# Altium PCB SG2002_work_174.PcbDoc (part 2 of 2)
Units mm, origin at the board's own origin, x right, y up, seen from the top; angles counter-clockwise.
Board outline 38 x 38 mm, 4 copper layers (TOP, GND, POWER, BOTTOM), stack 0.732 mm thick; 197 components, 122 nets, 613 pads, 461 vias.
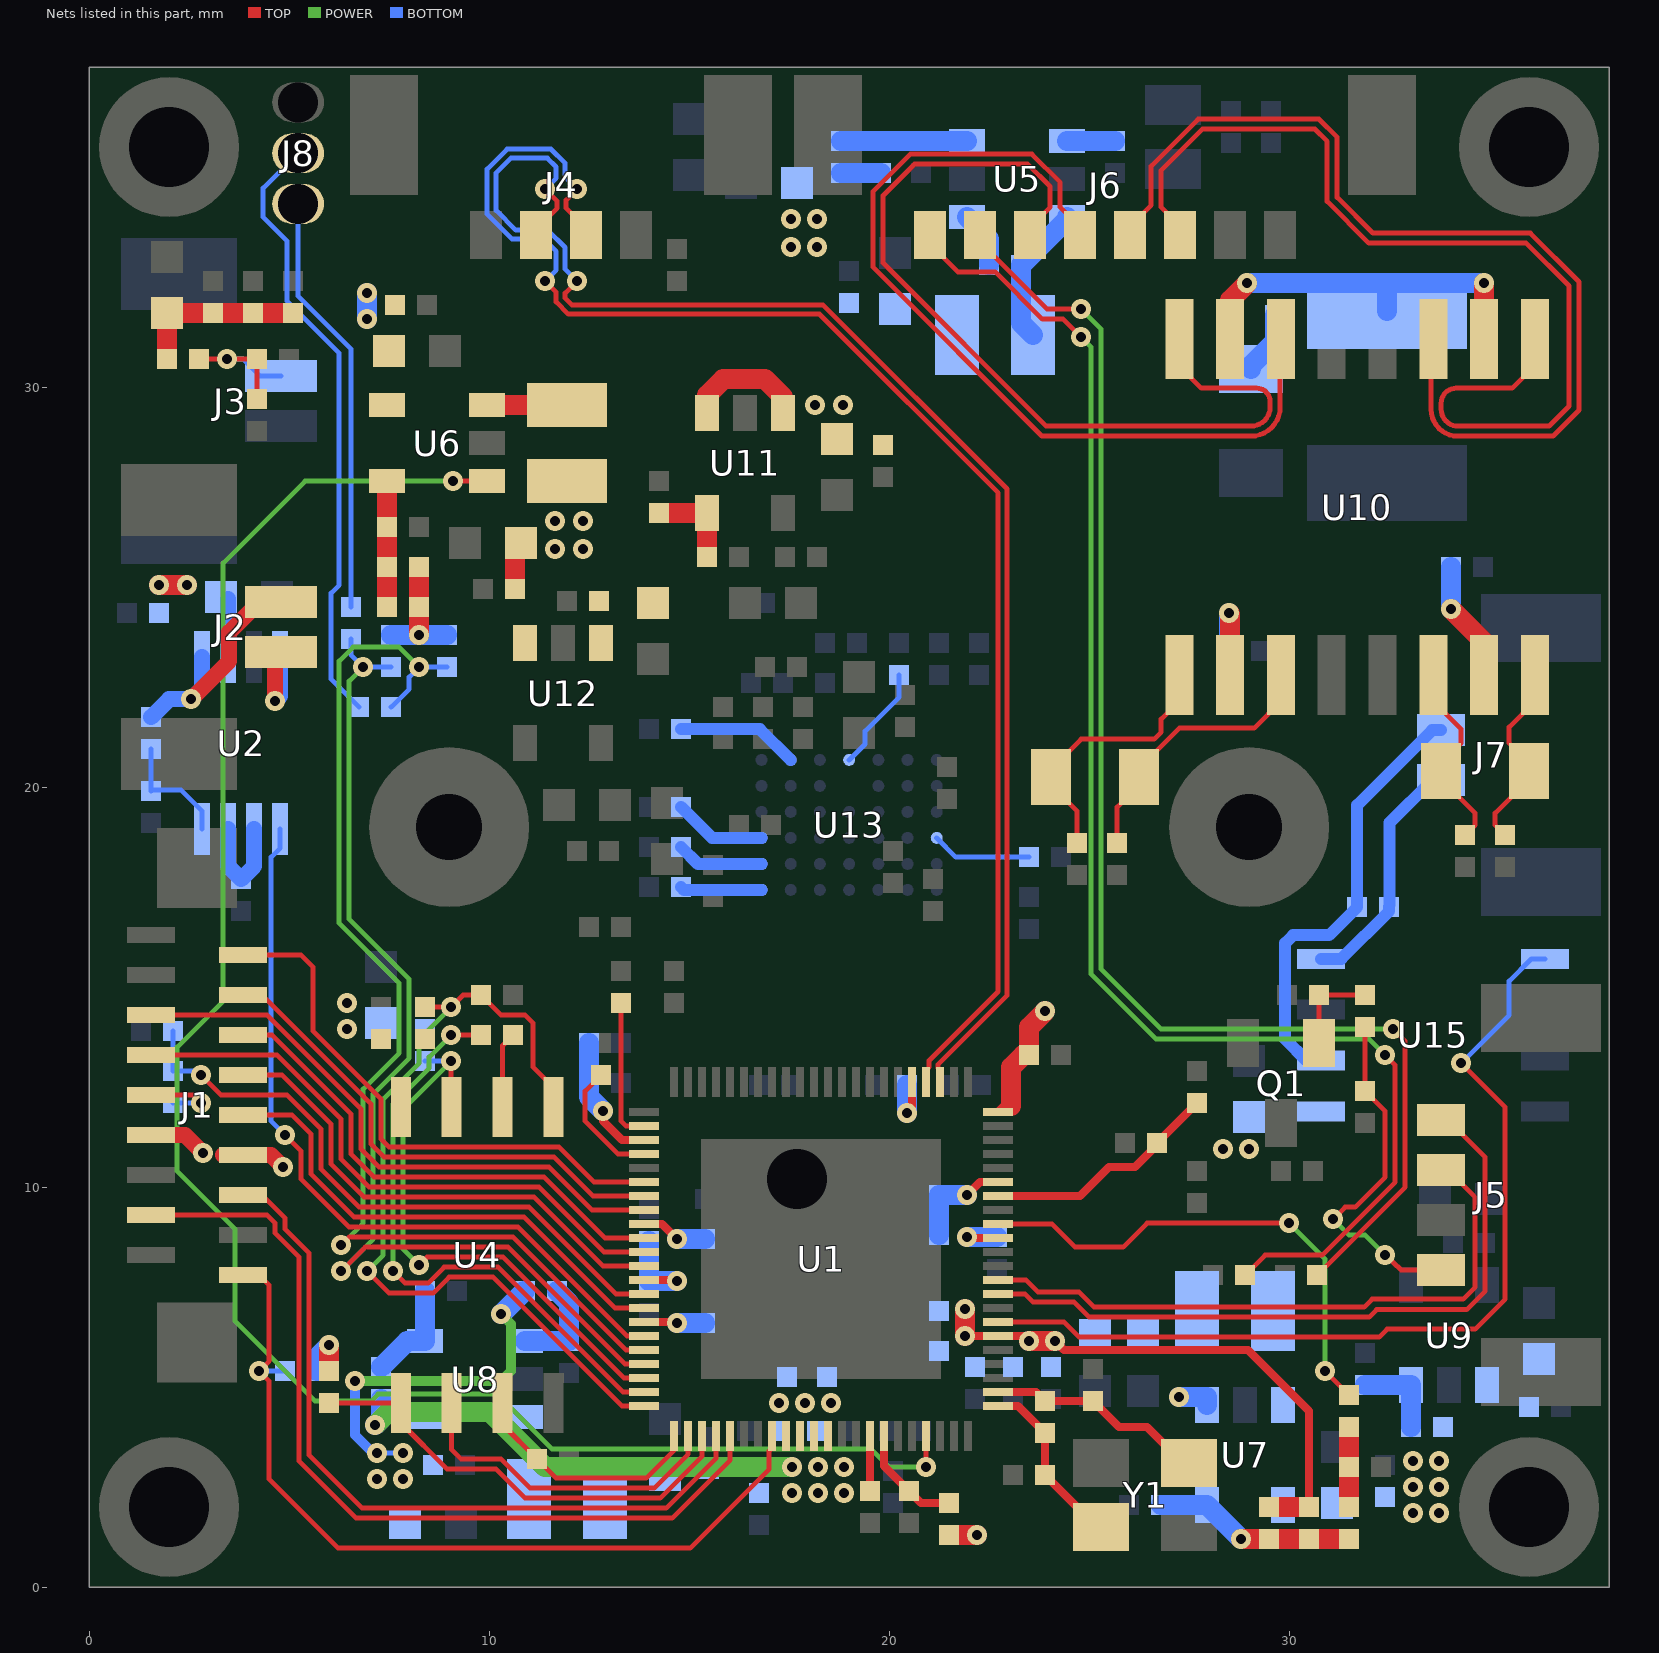
[diagram p4: the nets of this part, all layers, seen from the top]

## Via types
v1: diameter 0.5, hole 0.25, TOP to BOTTOM, 439 vias
v2: diameter 0.4, hole 0.2, TOP to BOTTOM, 22 vias

## Nets (pads, with @x,y where several pads share a name; then routed paths per layer and width w, separated by ;. In a path a pad name is that pad's centre, name@x,y a point inside that pad or via, vN(x,y) a via of type N, cw(c..) or ccw(c..) an arc to the next point about the centre after c; other vN are vias at no path point) (continued)
IRCUT_ENB: U1.51 U15.5 | length 23.3
  TOP w0.125: U1.51@22.725,6.625 24.375,6.625 24.75,6.25 32.25,6.25 32.45,6.45 34.65,6.45 35.4,7.2 35.4,12 v1(34.3,13.1)
  BOTTOM w0.125: v1(34.3,13.1) 35.5,14.3 35.5,15.15 36.055,15.705 U15.5@36.4,15.705
IRLED_PWM: J5.1 U1.53 | length 17.5
  TOP w0.125: U1.53@22.725,7.325 23.4,7.325 23.6,7.125 24.625,7.125 25,6.75 32,6.75 32.187,6.937 34.438,6.937 34.9,7.4 34.9,10.75 33.975,11.675 J5.1@33.8,11.675
LNK_LED: J6.2 R59.1 | length 35.2
  TOP w0.125: J6.2@22.275,33.8 22.275,33.625 23.95,31.95 v1(24.8,31.95) ; R59.1@30.7,7.8 32.9,10 32.9,13.65 v1(32.6,13.95)
  POWER w0.125: v1(24.8,31.95) 25.3,31.45 25.3,15.45 26.8,13.95 v1(32.6,13.95)
MEMS_MIC1_VDD: C39.2 C40.2 R26.1 R27.1 R28.2 | length 4.3
  TOP w0.5: R27.1@1.95,30.7 C39.2@1.95,31.85 R28.2@3.1,31.85 C40.2@4.1,31.85 R26.1@5.1,31.85
MIC1_OUTPUT: C41.2 J3.1 R27.2 R29.1 | length 4
  TOP w0.125: R27.2@2.75,30.7 v1(3.45,30.7) R29.1@4.2,30.7 C41.2@4.2,29.7
  BOTTOM w0.125: v1(3.45,30.7) 3.85,30.7 4.275,30.275 J3.1@4.8,30.275
N19124268: DA4.N R57.1 U10.10 U10.15 | length 9.6
  TOP w0.5: U10.15@28.525,31.2 28.525,32.175 v1(28.95,32.6) ; U10.10@34.875,31.2 v1(34.875,32.6)
  BOTTOM w0.5: v1(28.95,32.6) R57.1@29.65,32.6 DA4.N@32.45,32.6 ; DA4.N@32.45,31.9 DA4.N@32.45,32.6 ; v1(34.875,32.6) DA4.N@32.45,32.6
N19124326: C78.2 U10.7 | length 3
  TOP w0.5: v1(34.05,24.45) 34.875,23.625 U10.7@34.875,22.8
  BOTTOM w0.5: v1(34.05,24.45) C78.2@34.05,25.5
N19178192: C45.1 U5.1 | length 1.4
  BOTTOM w0.5: U5.1@21.95,34.25 22.5,33.7 C45.1@22.5,33.05
N19178196: C45.2 L1.1 U5.6 | length 3.6
  BOTTOM w0.5: L1.1@23.6,31.3 23.3,31.6 C45.2@23.3,33.05 24.45,34.2 U5.6@24.45,34.25
N19178310: C46.1 R34.2 R36.1 U5.3 | length 3.1
  BOTTOM w0.5: C46.1@18.8,36.15 R34.2@19.8,36.15 R36.1@20.8,36.15 U5.3@21.95,36.15
N19178371: R35.1 U5.4 | length 1.2
  BOTTOM w0.5: U5.4@24.45,36.15 R35.1@25.65,36.15
N19299732: L4.1 U8.3
N19299837: R44.1 R46.2 U8.5 | length 2.6
  BOTTOM w0.5: R44.1@7.3,5.5 7.95,6.15 U8.5@8.4,6.15 R46.2@8.4,7.4
N19299849: C69.1 R45.1 U8.1 | length 2.5
  BOTTOM w0.5: U8.1@10.9,6.15 C69.1@12,6.15 12,7.1 R45.1@11.7,7.4
N19981555: L3.1 U7.3
N19981677: C57.1 R39.2 R41.2 R43.1 U7.5 | length 5.1
  TOP w0.5: v1(28.8,1.2) R39.2@29.5,1.2 C57.1@30.5,1.2 R41.2@31.5,1.2
  BOTTOM w0.5: R43.1@26.8,2.05 U7.5@27.95,2.05 v1(28.8,1.2)
N19981766: C63.1 R41.1 R42.2 | length 2
  TOP w0.5: R41.1@31.5,2 C63.1@31.5,3 R42.2@31.5,4
N20100926: L2.1 U6.3 | length 2
  TOP w0.5: U6.3@9.95,29.55 L2.1@11.95,29.55
N20101039: C54.1 R37.2 R38.1 U6.5 | length 3.2
  TOP w0.5: R37.2@7.45,24.5 C54.1@7.45,25.5 R38.1@7.45,26.5 U6.5@7.45,27.65
N20359461: R60.2 R61.2 U11.4 | length 2.3
  TOP w0.5: R61.2@14.25,26.85 U11.4@15.45,26.85 R60.2@15.45,25.75
N20419535: C102.2 U13.E7 | length 2.2
  BOTTOM w0.3: C102.2@14.8,18.5 15.221,18.079 U13.E7@16.81,18.079
N20419548: C103.2 U13.F7 | length 2
  BOTTOM w0.3: C103.2@14.8,17.5 14.871,17.429 U13.F7@16.81,17.429
N20419561: C104.2 U13.A6 | length 3.1
  BOTTOM w0.3: C104.2@14.8,21.45 16.769,21.45 U13.A6@17.54,20.679
N20419574: C105.2 U13.D7 | length 2.3
  BOTTOM w0.3: C105.2@14.8,19.5 14.831,19.477 15.578,18.729 U13.D7@16.81,18.729
N20435624: C74.1 R47.2 U9.3 | length 2.2
  BOTTOM w0.5: C74.1@31.9,5.05 U9.3@33.05,5.05 R47.2@33.05,4
N20543108: C2.2 U1.2 | length 3.6
  TOP w0.125: C2.2@13.3,14.6 13.3,11.65 13.425,11.525 U1.2@13.875,11.525
N20543141: C3.1 U1.4 | length 3.1
  TOP w0.125: C3.1@12.8,12.8 12.4,12.4 12.4,11.65 13.225,10.825 U1.4@13.875,10.825
N20543163: C5.2 C6.2 U1.3 | length 3.3
  TOP w0.2: v1(12.85,11.9) 12.85,11.65 13.325,11.175 U1.3@13.875,11.175
  BOTTOM w0.5: C6.2@12.5,13.6 C5.2@12.5,12.6 12.5,12.25 v1(12.85,11.9)
N20543994: J8.2 R9.1 | length 15.4
  BOTTOM w0.125: J8.2@5.225,35.85 4.35,34.975 4.35,34.25 4.95,33.65 4.95,32.15 6.25,30.85 6.25,25.05 6.05,24.85 6.05,22.7 R9.1@6.75,22
N20546407: J2.1 U2.8 | length 2.5
  TOP w0.4: v1(4.65,22.15) 4.65,23.325 J2.1@4.8,23.375
  BOTTOM w0.4: v1(4.65,22.15) 4.775,22.275 U2.8@4.775,23.25
N20546461: C37.2 U2.2 U2.3 | length 2.8
  BOTTOM w0.4: U2.3@3.475,18.95 3.475,18.025 C37.2@3.8,17.7 4.125,18.025 U2.2@4.125,18.95
N20546469: J2.2 R4.1 U2.5 | length 6
  TOP w0.4: v1(2.55,22.2) 3.5,23.15 3.5,23.875 4.25,24.625 J2.2@4.8,24.625
  BOTTOM w0.4: R4.1@1.55,21.75 2,22.2 v1(2.55,22.2) 2.822,22.472 2.822,22.653 2.825,22.656 U2.5@2.825,23.25
N20546492: R4.2 R25.1 U2.4 | length 3
  BOTTOM w0.125: R4.2@1.55,20.95 R25.1@1.55,19.9 1.575,19.925 2.3,19.925 2.825,19.4 U2.4@2.825,18.95
N20548092: J8.1 R10.1 | length 10.6
  BOTTOM w0.125: J8.1@5.225,34.58 5.225,32.275 6.55,30.95 R10.1@6.55,24.5
N20549401: C80.2 R57.2 | length 1.6
  BOTTOM w0.5: C80.2@29.05,30.45 29.05,30.55 29.65,31.15 R57.2@29.65,31.8
N20551524: C77.2 U10.2 | length 2.5
  TOP w0.5: v1(28.5,24.35) 28.525,24.325 U10.2@28.525,22.8
  BOTTOM w0.5: C77.2@28.5,23.4 v1(28.5,24.35)
N20551619: D2.P R5.2 U10.3 | length 7
  TOP w0.125: R5.2@25.7,18.6 25.7,19.5 26.25,20.05 D2.P@26.25,20.25 26.25,20.469 27.256,21.475 29.125,21.475 29.795,22.145 U10.3@29.795,22.8
N20551621: D2.N R3.2 U10.1 | length 6.9
  TOP w0.125: R3.2@24.7,18.6 24.7,19.4 24.05,20.05 D2.N@24.05,20.25 24.05,20.45 24.8,21.2 26.627,21.2 26.8,21.373 26.8,21.7 27.255,22.155 U10.1@27.255,22.8
N20551631: D3.N R12.2 U10.6 | length 5
  TOP w0.125: U10.6@33.605,22.8 33.605,22.145 34.3,21.45 34.3,21.1 33.8,20.6 D3.N@33.8,20.4 33.8,20.2 34.65,19.35 34.65,19.05 R12.2@34.4,18.8
N20551633: D3.P R13.2 U10.8 | length 4.9
  TOP w0.125: R13.2@35.4,18.8 35.15,19.05 35.15,19.35 36,20.2 D3.P@36,20.4 36,20.6 35.5,21.1 35.5,21.5 36.145,22.145 U10.8@36.145,22.8
N20557326: Q1.B R53.2 R54.2 | length 2.4
  TOP w0.125: Q1.B@30.75,13.6 R54.2@30.75,14.8 R53.2@31.9,14.8
N20557495: J5.4 R51.1 R53.1 | length 8.9
  TOP w0.125: v1(31.1,9.2) 31.4,9.5 31.65,9.5 32.4,10.25 32.4,11.9 R51.1@31.9,12.4 R53.1@31.9,14 ; v1(32.4,8.3) 32.8,7.925 J5.4@33.8,7.925
  POWER w0.125: v1(31.1,9.2) 31.5,8.8 31.9,8.8 v1(32.4,8.3)
N20559056: R64.2 U13.D1 | length 2.5
  BOTTOM w0.125: U13.D1@21.19,18.729 21.669,18.25 R64.2@23.5,18.25
N20604743: C108.2 J7.2 U15.2 | length 11.1
  BOTTOM w0.3: U15.2@30.8,13.165 30.435,13.165 29.9,13.7 29.9,16.1 30.1,16.3 31,16.3 C108.2@31.7,17 31.7,19.55 33.575,21.425 J7.2@33.8,21.425
N20605010: C108.1 J7.1 U15.4 | length 6.1
  BOTTOM w0.3: U15.4@30.8,15.705 31.305,15.705 32.5,16.9 C108.1@32.5,17 32.511,17.068 32.511,19.111 33.575,20.175 J7.1@33.8,20.175
N20631063: J1.9 R2.2 | length 2
  TOP w0.125: J1.9@1.55,12.3 2.6,12.3 v1(2.8,12.1)
  BOTTOM w0.125: R2.2@2.1,12.1 v1(2.8,12.1)
N205430461: C1.1 U1.37 | length 1.4
  TOP w0.125: C1.1@19.525,2.4 C1.1@19.525,2.493
  TOP w0.2: C1.1@19.525,2.493 U1.37@19.525,3.775
P5V_IN: C35.1 C36.1 C46.2 C47.1 C48.1 C51.1 C53.1 C61.1 C62.1 C65.1 C66.1 C70.1 C71.1 C106.1 L1.2 R18.2 R33.2 R34.1 R45.2 R47.1 U2.6 U6.4 U7.1 U7.4 U8.4 U9.1 U15.1 | length 14.5
  TOP w0.5: v1(1.75,25.05) v1(2.45,25.05) ; R18.2@21.5,1.3 v1(22.2,1.3)
  POWER w0.25: v1(6.65,5.15) 10.3,5.15 10.55,5.4 10.55,6.575 v1(10.3,6.825)
  BOTTOM w0.125: v1(7.2,3.35) v1(7.85,3.35)
  BOTTOM w0.25: v1(6.65,5.15) 6.65,3.8 7.1,3.35 v1(7.2,3.35)
  BOTTOM w0.4: U2.6@3.475,23.25 C35.1@3.475,24.7
  BOTTOM w0.5: v1(6.95,31.7) v1(6.95,32.35) ; v1(10.3,6.825) 10.875,7.4 R45.2@10.9,7.4 ; C46.2@18.8,35.35 R34.1@19.8,35.35 ; v1(27.25,4.75) 27.95,4.75 U7.1@27.95,4.55
  other v1: 33.1,1.85 33.75,1.85 33.1,2.5 33.75,2.5 7.2,2.7 7.85,2.7 33.1,3.15 33.75,3.15 28.35,10.95 29,10.95 17.55,33.5 18.2,33.5 17.55,34.2 18.2,34.2
PWM0_BUCK: R42.1 U1.58 | length 12.7
  TOP w0.125: U1.58@22.725,9.075 24.075,9.075 24.65,8.5 25.85,8.5 26.45,9.1 v1(30,9.1) ; v1(30.9,5.4) R42.1@31.5,4.8
  POWER w0.125: v1(30,9.1) 30.9,8.2 v1(30.9,5.4)
PWR_SEQ2: U1.41 U6.1 | length 47.2
  TOP w0.125: v1(9.1,27.65) U6.1@9.95,27.65 ; v1(20.925,3) U1.41@20.925,3.775
  POWER w0.125: v1(9.1,27.65) 5.4,27.65 3.35,25.6 3.35,14.65 2.2,13.5 2.2,10.4 3.65,8.95 3.65,6.65 5.65,4.65 7.05,4.65 7.225,4.825 10.2,4.825 11.575,3.45 19.55,3.45 20,3 v1(20.925,3)
PWR_VBAT_DET: R18.1 R20.2 U1.38 | length 2.8
  TOP w0.2: U1.38@19.875,3.775 19.875,3.025 R20.2@20.5,2.4 20.8,2.1 R18.1@21.5,2.1
PWRDOWN: R63.1 U13.A4 | length 2.6
  BOTTOM w0.125: U13.A4@19,20.679 19.4,21.079 19.4,21.4 20.25,22.25 R63.1@20.25,22.8
RESET: J1.18 R19.2 U1.30 | length 21.3
  TOP w0.125: J1.18@3.85,7.8 4.25,7.8 4.5,7.55 4.5,5.65 v1(4.25,5.4) 4.5,5.15 4.5,2.7 6.225,0.975 15.025,0.975 17,2.95 17,3.4 17.075,3.475 U1.30@17.075,3.775
  BOTTOM w0.125: v1(4.25,5.4) R19.2@4.9,5.4
RX_D+: J6.5 U10.11 | length 25
  TOP w0.125: J6.5@26.025,33.8 26.025,34.025 26.55,34.55 26.55,35.523 27.727,36.7 30.749,36.7 31.2,36.249 31.2,34.746 32.096,33.85 36.03,33.85 37.25,32.63 37.25,29.427 36.598,28.775 34.217,28.775 cw(c34.217,29.442) 33.55,29.442 33.55,31.1 33.55,31.145 U10.11@33.605,31.2
RX_D-: J6.6 U10.9 | length 25.2
  TOP w0.125: J6.6@27.275,33.8 27.275,34.025 26.8,34.5 26.8,35.419 27.831,36.45 30.646,36.45 30.95,36.146 30.95,34.643 31.993,33.6 35.927,33.6 37,32.527 37,29.53 36.495,29.025 34.221,29.025 cw(c34.221,29.446) 33.8,29.446 33.8,29.6 cw(c34.175,29.6) 34.175,29.975 35.575,29.975 36.145,30.545 U10.9@36.145,31.2
SD_PWR_EN: J1.10 U1.15 | length 12.6
  TOP w0.125: J1.10@3.85,11.8 5.075,11.8 5.55,11.325 5.55,10.325 6.625,9.25 10.875,9.25 13.15,6.975 U1.15@13.875,6.975
SD_SD0_CD: C4.1 R2.1 U1.14 | length 15.7
  TOP w0.125: v1(2.8,12.8) 3.3,12.3 4.95,12.3 5.8,11.45 5.8,10.45 6.75,9.5 11,9.5 13.175,7.325 U1.14@13.875,7.325
  BOTTOM w0.125: C4.1@2.1,13.9 R2.1@2.1,12.9 2.7,12.9 v1(2.8,12.8)
SD_SD0_CLK: J1.2 U1.6 | length 13.9
  TOP w0.125: J1.2@3.85,15.8 5.3,15.8 5.6,15.5 5.6,13.9 7.3,12.2 7.3,11.2 7.5,11 11.75,11 12.625,10.125 U1.6@13.875,10.125
SD_SD0_CMD: J1.4 U1.7 | length 12.7
  TOP w0.125: J1.4@3.85,14.8 4.325,14.8 7.05,12.075 7.05,11.075 7.375,10.75 11.625,10.75 12.6,9.775 U1.7@13.875,9.775
SD_SD0_D0: J1.5 U1.8 | length 14.9
  TOP w0.125: J1.5@1.55,14.3 4.45,14.3 6.8,11.95 6.8,10.95 7.25,10.5 11.5,10.5 12.575,9.425 U1.8@13.875,9.425
SD_SD0_D1: J1.6 U1.10 | length 12.7
  TOP w0.125: J1.6@3.85,13.8 4.575,13.8 6.55,11.825 6.55,10.825 7.125,10.25 11.375,10.25 12.9,8.725 U1.10@13.875,8.725
SD_SD0_D2: J1.7 U1.11 | length 15
  TOP w0.125: J1.7@1.55,13.3 4.7,13.3 6.3,11.7 6.3,10.7 7,10 11.25,10 12.875,8.375 U1.11@13.875,8.375
SD_SD0_D3: J1.8 U1.12 | length 12.6
  TOP w0.125: J1.8@3.85,12.8 4.825,12.8 6.05,11.575 6.05,10.575 6.875,9.75 11.125,9.75 12.85,8.025 U1.12@13.875,8.025
SPD_LED: J6.1 R58.2 | length 37.2
  TOP w0.125: J6.1@21.025,33.8 21.05,33.775 21.05,33.55 21.719,32.881 22.65,32.881 23.831,31.7 24.35,31.7 v1(24.8,31.25) ; R58.2@28.9,7.8 29.4,8.3 30.825,8.3 32.65,10.125 32.65,13.05 v1(32.4,13.3)
  POWER w0.125: v1(24.8,31.25) 25.05,31 25.05,15.325 26.675,13.7 32,13.7 v1(32.4,13.3)
SPI_CLK: R30.2 U1.21 | length 15.1
  TOP w0.125: v1(7.6,7.9) 7.9,7.6 8.475,7.6 8.875,8 10.225,8 13.35,4.875 U1.21@13.875,4.875 ; v1(9.05,13.8) R30.2@9.8,13.8
  POWER w0.125: v1(7.6,7.9) 7.6,12.075 8.5,12.975 8.5,13.25 v1(9.05,13.8)
SPI_CS_X: R31.2 U1.25 U4.1 | length 11.5
  TOP w0.125: R31.2@6,4.6 U4.1@7.795,4.6 7.795,4.105 8.95,2.95 10.175,2.95 10.9,2.225 14.275,2.225 15.325,3.275 U1.25@15.325,3.775
SPI_HOLD_X: R32.2 U1.20 U4.7 | length 14.5
  TOP w0.125: v1(8.25,8.05) 8.45,8.25 10.35,8.25 13.375,5.225 U1.20@13.875,5.225 ; v1(9.05,13.15) 9.05,12 U4.7@9.065,12
  POWER w0.125: v1(8.25,8.05) 7.85,8.45 7.85,11.95 v1(9.05,13.15)
  BOTTOM w0.125: R32.2@8.4,13.15 v1(9.05,13.15)
SPI_MISO: U1.24 U4.2 | length 8.3
  TOP w0.125: U4.2@9.065,4.6 9.065,3.435 9.3,3.2 10.3,3.2 11.025,2.475 14.125,2.475 14.975,3.325 U1.24@14.975,3.775
SPI_MOSI: R11.2 R14.1 U1.22 U4.5 | length 21.5
  TOP w0.125: v1(6.95,7.9) 7.5,7.35 8.6,7.35 9,7.75 10.1,7.75 13.325,4.525 U1.22@13.875,4.525 ; R11.2@8.4,14.5 v1(9.05,14.5) 9.348,14.798 R14.1@9.8,14.8 10.3,14.3 10.9,14.3 11.1,14.1 11.1,13 11.605,12.495 U4.5@11.605,12
  POWER w0.125: v1(6.95,7.9) 7.35,8.3 7.35,12.2 8.25,13.1 8.25,13.7 v1(9.05,14.5)
SPI_SCK: R30.1 U4.6 | length 1.9
  TOP w0.125: U4.6@10.335,12 10.335,13.535 R30.1@10.6,13.8
SPI_VCC: C20.1 C21.1 C22.1 C23.1 C43.1 C44.1 C54.2 C55.1 C56.1 C81.1 C82.1 C87.1 C88.1 J1.11 J1.12 L2.2 R6.1 R7.1 R11.1 R19.1 R31.1 R32.1 R37.1 U1.13 U1.57 U1.66 U4.8 U11.1 U11.3 U12.1 U12.3 | length 19.3
  TOP w0.2: U1.13@13.875,7.675 14.7,7.675 v1(14.7,7.65) ; v1(21.95,8.75) 21.975,8.725 U1.57@22.725,8.725 ; U1.66@22.725,11.875 22.875,12.025 23.05,12.025
  TOP w0.4: J1.11@1.55,11.3 2.4,11.3 v1(2.85,10.85) ; J1.12@3.35,10.8 J1.12@3.85,10.8 4.55,10.8 v1(4.85,10.5)
  TOP w0.5: R31.1@6,5.4 v1(6,6.05) ; v1(8.25,23.8) R37.1@8.25,24.5 C54.2@8.25,25.5 ; C56.1@10.65,24.95 10.65,26.1 C55.1@10.8,26.1 ; U11.3@15.45,29.35 15.45,29.8 15.85,30.2 16.9,30.2 17.35,29.75 U11.1@17.35,29.35 ; 23.05,12.025 23.05,13 23.35,13.3 C20.1@23.5,13.3 23.5,14 v1(23.9,14.4)
  BOTTOM w0.5: R19.1@5.7,5.4 5.7,5.75 v1(6,6.05) ; R6.1@7.55,23.8 v1(8.25,23.8) R7.1@8.95,23.8 ; C22.1@14,8.65 C23.1@14,7.65 v1(14.7,7.65) ; v1(21.95,8.75) C21.1@22.7,8.75
  other v1: 6.45,13.95 6.45,14.6 11.65,25.95 12.35,25.95 11.65,26.65 12.35,26.65 18.15,29.55 18.85,29.55
SPI_WP_X: R15.1 U1.23 U4.3 | length 6
  TOP w0.125: U4.3@10.335,4.6 10.335,4.065 R15.1@11.2,3.2 11.675,2.725 13.925,2.725 14.625,3.425 U1.23@14.625,3.775
SPK_EN: U1.17 U2.1 | length 19.4
  TOP w0.125: v1(4.9,11.3) 5.3,10.9 5.3,10.2 6.5,9 10.725,9 13.45,6.275 U1.17@13.875,6.275
  BOTTOM w0.125: U2.1@4.775,18.95 4.775,18.475 4.55,18.25 4.55,11.65 v1(4.9,11.3)
SYS_XTAL_IN: C18.1 R8.1 U1.45 Y1.3 | length 4.4
  TOP w0.2: U1.45@22.725,4.525 23.225,4.525 R8.1@23.9,3.85 C18.1@23.9,2.8 25.2,1.5 Y1.3@25.3,1.5
SYS_XTAL_OUT: C17.1 R8.2 U1.46 Y1.1 | length 5.5
  TOP w0.2: U1.46@22.725,4.875 23.675,4.875 R8.2@23.9,4.65 C17.1@25.1,4.65 25.75,4 26.45,4 27.35,3.1 Y1.1@27.5,3.1
TX_D+: J6.3 U10.16 | length 23
  TOP w0.125: J6.3@23.525,33.8 23.525,34 24.025,34.5 24.025,35.014 23.464,35.575 20.635,35.575 19.85,34.79 19.85,33.102 23.927,29.025 29.049,29.025 ccw(c29.049,29.501) 29.525,29.501 29.525,29.638 ccw(c29.188,29.638) 29.188,29.975 27.805,29.975 27.255,30.525 U10.16@27.255,31.2
TX_D-: J6.4 U10.14 | length 22.8
  TOP w0.125: J6.4@24.775,33.8 24.775,34 24.275,34.5 24.275,35.118 23.568,35.825 20.532,35.825 19.6,34.893 19.6,32.998 23.823,28.775 29.049,28.775 ccw(c29.049,29.501) 29.775,29.501 29.775,31.2 U10.14@29.795,31.2
UART0_RX: R6.2 R10.2 U1.19 | length 27.1
  TOP w0.125: v1(6.3,7.9) 6.9,8.5 10.475,8.5 13.4,5.575 U1.19@13.875,5.575
  POWER w0.125: v1(6.3,7.9) 7.1,8.7 7.1,12.325 8,13.225 8,15.2 6.5,16.7 6.5,22.65 v1(6.85,23)
  BOTTOM w0.125: R10.2@6.55,23.7 6.55,23.3 v1(6.85,23) R6.2@7.55,23
UART0_TX: R7.2 R9.2 U1.18 | length 29
  TOP w0.125: v1(6.3,8.55) 6.5,8.75 10.6,8.75 13.425,5.925 U1.18@13.875,5.925
  POWER w0.125: v1(6.3,8.55) 6.85,9.1 6.85,12.45 7.75,13.35 7.75,15.1 6.25,16.6 6.25,23.15 6.6,23.5 7.75,23.5 v1(8.25,23)
  BOTTOM w0.125: R9.2@7.55,22 8,22.45 8,22.75 v1(8.25,23) R7.2@8.95,23
UART1_RX: J1.15 U1.27 | length 21.9
  TOP w0.125: J1.15@1.55,9.3 4.45,9.3 4.65,9.1 4.65,8.85 5.25,8.25 5.25,3.15 6.675,1.725 14.575,1.725 16.025,3.175 U1.27@16.025,3.775
UART1_TX: J1.14 U1.26 | length 19.3
  TOP w0.125: J1.14@3.85,9.8 4.325,9.8 4.9,9.225 4.9,8.95 5.5,8.35 5.5,3.3 6.825,1.975 14.425,1.975 15.675,3.225 U1.26@15.675,3.775
USB_DM: J4.3 U1.70 | length 37.8
  TOP w0.125: v1(11.4,32.65) 11.675,32.375 11.675,32.132 11.982,31.825 18.258,31.825 22.725,27.358 22.725,14.888 21,13.163 21,13 20.925,12.925 U1.70@20.925,12.625 ; v1(12.2,34.95) 11.925,34.675 11.925,34.475 12.425,33.975 J4.3@12.425,33.8
  BOTTOM w0.125: v1(11.4,32.65) 11.675,32.925 11.675,33.396 11.371,33.7 10.575,33.7 9.95,34.325 9.95,35.449 10.451,35.95 11.547,35.95 11.9,35.597 11.9,35.25 v1(12.2,34.95)
USB_DP: J4.2 U1.69 | length 37.1
  TOP w0.125: J4.2@11.175,33.8 11.175,33.95 11.7,34.475 11.7,34.65 v1(11.4,34.95) ; v1(12.2,32.65) 11.9,32.35 11.9,32.225 12.075,32.05 18.351,32.05 22.95,27.451 22.95,14.795 21.225,13.07 21.225,12.975 21.275,12.925 U1.69@21.275,12.625
  BOTTOM w0.125: v1(11.4,34.95) 11.675,35.225 11.675,35.504 11.454,35.725 10.544,35.725 10.175,35.356 10.175,34.418 10.668,33.925 11.464,33.925 11.9,33.489 11.9,32.95 v1(12.2,32.65)
USB_VBUS_DET: R55.1 R56.2 U1.60 | length 6
  TOP w0.2: U1.60@22.725,9.775 24.775,9.775 25.5,10.5 26.15,10.5 26.7,11.05 R56.2@26.7,11.1 R55.1@27.7,12.1
VDDC: C24.1 C25.1 C26.1 C27.1 C28.1 C29.1 C30.1 C31.1 C32.1 C57.2 C58.1 C59.1 C60.1 L3.2 R39.1 U1.9 U1.16 U1.50 U1.61 U1.71 | length 20.8
  TOP w0.2: U1.16@13.875,6.625 14.65,6.625 v1(14.7,6.6) ; U1.9@13.875,9.075 14.325,9.075 v1(14.7,8.7) ; v1(20.45,11.85) 20.575,11.975 U1.71@20.575,12.625 ; v1(21.9,6.275) U1.50@22.725,6.275 23.375,6.275 v1(23.5,6.15) ; v1(21.95,9.8) 22.275,10.125 U1.61@22.725,10.125 ; v1(24.15,6.15) 24.375,5.925 28.975,5.925 30.5,4.4 C57.2@30.5,2
  TOP w0.5: v1(21.9,6.275) v1(21.9,6.95) ; v1(23.5,6.15) v1(24.15,6.15) ; R39.1@29.5,2 C57.2@30.5,2
  BOTTOM w0.5: v1(14.7,6.6) C30.1@15.4,6.6 ; v1(14.7,8.7) C29.1@15.4,8.7 ; v1(20.45,11.85) C31.1@20.45,12.55 ; C28.1@21.25,8.8 C32.1@21.25,9.8 v1(21.95,9.8)
VDDQ_1.35V: C12.1 C13.1 C14.1 C15.1 C16.1 C67.1 C68.1 L4.2 R44.2 U1.31 U1.32 U1.33 U1.34 | length 11.8
  POWER w0.5: v1(7.15,4.05) 7.475,4.375 10.025,4.375 11.4,3 v1(17.575,3)
  BOTTOM w0.5: v1(7.15,4.05) 7.3,4.2 R44.2@7.3,4.7
  other v1: 17.575,2.35 18.225,2.35 18.875,2.35 18.225,3 18.875,3 17.25,4.6 17.9,4.6 18.55,4.6
WLED_PWM: J5.2 U1.54 | length 15.8
  TOP w0.125: U1.54@22.725,7.675 23.425,7.675 23.725,7.375 24.75,7.375 25.125,7 31.875,7 32.075,7.2 34.35,7.2 34.65,7.5 34.65,9.75 33.975,10.425 J5.2@33.8,10.425
pads on no net: U1.35 U1.40 U1.43 U1.44 U1.47 U1.48 U1.49 U1.67 U1.83 U1.87 U9.4 U10.4 U10.5 U10.12 U10.13 U12.4 U13.A2 U13.B2 U13.B6 U13.C6 U13.E1 U13.F1 U15.6

## Polygon pours and split planes (outlines as drawn)
CHASSI_GND on POWER "POWER-CHASSI_GND" (solid, remove dead copper, pour order 1): 26.675,13.513 29.565,13.513 cw(c29.565,13.413) 29.614,13.326 ccw(c29.8,13) 29.47,13.178 cw(c29.382,13.225) 29.382,13.125 25.912,13.125 cw(c25.912,13.225) 25.867,13.136 ccw(c25.7,12.8) 25.533,13.136 cw(c25.488,13.225) 25.488,13.125 25.379,13.125 cw(c25.379,13.25) 25.29,13.162 24.643,13.809 cw(c24.714,13.879) 24.7,13.978 ccw(c24.65,14.35) 25.025,14.35 25.025,14.843 cw(c25.125,14.843) 25.196,14.914 26.542,13.567 ccw(c26.675,13.7)
SPI_VCC on POWER "POWER-SPI_VCC" (solid, remove dead copper, pour order 8): 268 vertices, not listed, extent 2.4,4.475 25.6,29.8
CHASSI_GND on POWER "POWER-CHASSI_GND 1" (solid, remove dead copper, pour order 9): 12.204,8.125 cw(c12.204,8.25) 12.115,8.162 11.462,8.815 ccw(c11.196,8.55) 11.197,8.925 8.137,8.925 cw(c8.137,9.025) 8.037,9.025 8.037,11.831 cw(c8.137,11.831) 8.067,11.902 8.915,12.75 cw(c8.986,12.679) 8.999,12.778 ccw(c9.05,13.15) 9.323,13.407 cw(c9.396,13.475) 9.323,13.543 ccw(c9.05,13.8) 9.303,14.076 cw(c9.371,14.15) 9.303,14.224 ccw(c9.05,14.5) 8.675,14.5 ccw(c9.05,14.5) 8.678,14.449 cw(c8.579,14.437) 8.679,14.436 cw(c8.579,14.436) 8.65,14.365 8.358,14.073 cw(c8.288,14.144) 8.187,14.144 8.187,15.2 ccw(c8,15.2) 8.132,15.333 6.717,16.748 cw(c6.787,16.819) 6.687,16.819 6.687,22.529 cw(c6.788,22.529) 6.801,22.628 ccw(c6.85,23) 7.199,23.138 cw(c7.292,23.175) 7.292,23.275 7.669,23.275 cw(c7.668,23.175) 7.739,23.246 7.85,23.135 cw(c7.779,23.064) 7.879,23.064 cw(c7.779,23.063) 7.879,23.051 ccw(c8.25,23) 7.875,23 ccw(c8.25,23) 8.599,23.138 cw(c8.692,23.175) 8.692,23.275 11.247,23.275 ccw(c11.246,23.65) 11.512,23.385 14.815,26.688 cw(c14.904,26.6) 14.904,26.725 16.232,26.725 cw(c16.232,26.625) 16.332,26.625 cw(c16.232,26.625) 16.32,26.578 ccw(c16.65,26.4) 16.464,26.074 cw(c16.415,25.987) 16.415,25.887 16.25,25.887 ccw(c16.25,25.7) 16.117,25.833 12.618,22.333 ccw(c12.75,22.2) 12.562,22.2 12.562,15.625 ccw(c12.75,15.625) 12.618,15.492 13.543,14.567 ccw(c13.675,14.7) 13.675,14.513 14.806,14.513 cw(c14.806,14.412) 14.877,14.483 14.925,14.435 cw(c14.854,14.364) 14.954,14.364 cw(c14.854,14.363) 14.954,14.351 ccw(c15.325,14.3) 14.95,14.3 ccw(c15.325,14.3) 15.7,14.3 ccw(c15.325,14.3) 15.588,14.567 cw(c15.658,14.638) 15.583,14.704 ccw(c15.3,14.95) 15.564,15.216 cw(c15.634,15.288) 15.564,15.359 ccw(c15.3,15.625) 14.925,15.625 ccw(c15.3,15.625) 14.928,15.574 cw(c14.829,15.562) 14.929,15.561 cw(c14.829,15.561) 14.9,15.49 14.827,15.417 cw(c14.756,15.487) 14.756,15.388 14.044,15.388 cw(c14.044,15.487) 13.973,15.417 13.467,15.923 cw(c13.537,15.994) 13.437,15.994 13.437,21.781 cw(c13.537,21.781) 13.467,21.852 16.498,24.883 cw(c16.569,24.813) 16.569,24.913 18.183,24.913 cw(c18.183,24.812) 18.281,24.831 ccw(c18.65,24.901) 18.288,24.801 cw(c18.192,24.775) 18.292,24.775 cw(c18.192,24.775) 18.192,24.675 17.7,24.675 ccw(c17.7,24.3) 17.325,24.3 17.325,23.55 ccw(c17.7,23.55) 17.7,23.175 22.25,23.175 cw(c22.25,23.05) 22.375,23.05 22.375,18.2 cw(c22.25,18.2) 22.25,18.075 21.85,18.075 ccw(c21.85,17.7) 21.475,17.7 21.475,17.4 ccw(c21.85,17.4) 21.85,17.025 21.95,17.025 cw(c21.95,16.9) 22.075,16.9 22.075,13.779 cw(c21.975,13.779) 22.028,13.694 ccw(c22.225,13.375) 21.852,13.414 cw(c21.753,13.425) 21.753,13.325 19.15,13.325 ccw(c19.15,13.15) 19.05,13.294 cw(c18.993,13.376) 19.004,13.277 cw(c18.904,13.274) 18.994,13.229 ccw(c19.15,13.15) 18.975,13.15 cw(c18.85,13.15) 18.85,13.025 16.104,13.025 ccw(c16.104,12.65) 15.838,12.915 14.385,11.462 ccw(c14.65,11.196) 14.275,11.197 14.275,10.25 ccw(c14.65,10.25) 14.65,9.875 15.3,9.875 ccw(c15.3,10.25) 15.675,10.25 15.675,10.476 cw(c15.775,10.476) 15.78,10.576 ccw(c15.8,10.95) 16.159,11.058 cw(c16.255,11.087) 16.184,11.158 16.415,11.388 cw(c16.504,11.3) 16.504,11.425 19.25,11.425 ccw(c19.25,11.8) 19.625,11.8 19.625,12 cw(c19.75,12) 19.75,12.125 19.808,12.125 cw(c19.808,12.025) 19.901,11.988 ccw(c20.25,11.85) 19.875,11.85 19.875,8.85 cw(c19.75,8.85) 19.75,8.725 16.504,8.725 cw(c16.504,8.85) 16.415,8.762 16.162,9.015 ccw(c15.896,8.75) 15.897,9.125 14.65,9.125 ccw(c14.65,8.75) 14.275,8.75 14.275,8.4 ccw(c14.65,8.4) 14.301,8.262 cw(c14.208,8.225) 14.208,8.125
IOVDD on POWER "POWER-IOVDD" (solid, remove dead copper, pour order 7): 207 vertices, not listed, extent 14.4,2.7 36.8,24.55
CHASSI_GND on POWER "POWER-CHASSI_GND 2" (solid, remove dead copper, pour order 3): 21.85,10.175 cw(c21.85,10.3) 21.725,10.3 21.725,11.097 ccw(c21.35,11.097) 21.654,11.316 cw(c21.735,11.375) 21.735,11.475 22.696,11.475 cw(c22.696,11.35) 22.785,11.438 23.538,10.685 ccw(c23.804,10.95) 23.804,10.575 25.5,10.575 cw(c25.5,10.45) 25.625,10.45 25.625,8.392 cw(c25.525,8.392) 25.488,8.299 ccw(c25.35,7.95) 25.35,8.325 23.804,8.325 cw(c23.804,8.45) 23.715,8.362 23.062,9.015 ccw(c22.796,8.75) 22.796,9.125 22.392,9.125 cw(c22.392,9.225) 22.299,9.262 ccw(c21.95,9.4) 22.325,9.4 22.325,9.8 ccw(c21.95,9.8) 21.95,10.175
CHASSI_GND on POWER "POWER-CHASSI_GND 3" (solid, remove dead copper, pour order 4): 17.068,26.725 23.35,26.725 cw(c23.35,26.6) 23.475,26.6 23.475,24.742 cw(c23.375,24.742) 23.338,24.649 ccw(c23.2,24.3) 23.2,24.675 21.768,24.675 cw(c21.768,24.775) 21.668,24.775 cw(c21.768,24.775) 21.68,24.822 ccw(c21.35,25) 21.051,25.227 cw(c20.972,25.288) 20.972,25.188 20.746,25.188 cw(c20.746,25.288) 20.646,25.287 20.646,25.288 cw(c20.746,25.287) 20.652,25.322 ccw(c20.3,25.45) 20.248,25.821 cw(c20.235,25.92) 20.17,25.844 ccw(c20.05,25.7) 20.05,25.887 16.886,25.887 cw(c16.886,25.987) 16.836,26.074 ccw(c16.65,26.4) 16.98,26.578 cw(c17.068,26.625) 16.968,26.625 cw(c17.068,26.625)
5V_USB_OUT on POWER "POWER-5V_USB_OUT" (solid, remove dead copper, pour order 11): 0.748,0.25 cw(c0.75,0.75) 0.25,0.748 0.25,37.252 cw(c0.75,37.25) 0.748,37.75 37.252,37.75 cw(c37.25,37.25) 37.75,37.252 37.75,0.748 cw(c37.25,0.75) 37.252,0.25 34.225,0.25 cw(c34.225,0.35) 34.125,0.35 34.125,3.35 ccw(c33.95,3.35) 33.95,3.525 30.871,3.525 ccw(c30.871,3.35) 30.747,3.474 30.028,2.754 cw(c29.957,2.825) 29.957,2.725 28.775,2.725 cw(c28.775,2.825) 28.675,2.825 28.675,9.309 cw(c28.775,9.308) 28.696,9.37 ccw(c28.4,9.6) 28.707,9.815 cw(c28.789,9.872) 28.689,9.872 cw(c28.789,9.872) 28.745,9.962 cw(c28.8,9.85) 28.8,9.975 29.05,9.975 ccw(c29.05,10.35) 29.307,10.077 cw(c29.375,10.004) 29.443,10.077 ccw(c29.7,10.35) 29.7,9.975 34.446,9.975 cw(c34.446,9.85) 34.535,9.938 35.438,9.035 ccw(c35.704,9.3) 35.703,8.925 36.55,8.925 ccw(c36.55,9.3) 36.925,9.3 36.925,11.95 ccw(c36.55,11.95) 36.55,12.325 31.404,12.325 cw(c31.404,12.45) 31.315,12.362 30.662,13.015 ccw(c30.396,12.75) 30.397,13.125 30.218,13.125 cw(c30.218,13.225) 30.13,13.178 ccw(c29.8,13) 29.986,13.326 cw(c30.035,13.413) 30.035,13.513 31.881,13.513 cw(c31.881,13.412) 31.952,13.483 32,13.435 cw(c31.929,13.364) 32.029,13.364 cw(c31.929,13.363) 32.029,13.351 ccw(c32.4,13.3) 32.025,13.3 ccw(c32.4,13.3) 32.775,13.3 ccw(c32.4,13.3) 32.729,13.48 cw(c32.817,13.527) 32.771,13.616 ccw(c32.6,13.95) 32.302,14.177 cw(c32.222,14.238) 32.222,14.138 26.919,14.138 cw(c26.919,14.237) 26.848,14.167 25.517,15.498 cw(c25.587,15.569) 25.488,15.569 25.488,31.45 ccw(c25.3,31.45) 25.432,31.582 25.2,31.815 cw(c25.271,31.886) 25.171,31.886 cw(c25.271,31.887) 25.171,31.899 ccw(c24.8,31.95) 25.175,31.95 ccw(c24.8,31.95) 24.546,31.674 cw(c24.479,31.6) 24.546,31.526 ccw(c24.8,31.25) 24.77,30.876 cw(c24.763,30.776) 24.863,30.776 24.863,30.011 cw(c24.762,30.011) 24.739,29.914 ccw(c24.65,29.55) 24.65,29.925 19.092,29.925 cw(c19.092,30.025) 18.999,30.062 ccw(c18.65,30.2) 19.025,30.2 19.025,34.25 ccw(c18.65,34.25) 18.65,34.625 17.504,34.625 ccw(c17.504,34.25) 17.238,34.515 15.607,32.884 cw(c15.537,32.955) 15.508,32.859 ccw(c15.4,32.5) 15.041,32.392 cw(c14.945,32.363) 15.016,32.293 14.785,32.062 cw(c14.696,32.15) 14.696,32.025 11.512,32.025 cw(c11.512,32.125) 11.468,32.036 ccw(c11.3,31.7) 11.415,32.057 cw(c11.446,32.152) 11.346,32.141 cw(c11.252,32.173) 11.262,32.073 ccw(c11.3,31.7) 11.133,32.036 cw(c11.088,32.125) 11.088,32.025 10.504,32.025 cw(c10.504,32.15) 10.415,32.062 9.412,33.065 ccw(c9.146,32.8) 9.146,33.175 0.95,33.175 ccw(c0.95,32.8) 0.575,32.8 0.575,4.15 ccw(c0.95,4.15) 0.95,3.775 2.696,3.775 cw(c2.696,3.65) 2.785,3.738 3.738,2.785 cw(c3.65,2.696) 3.775,2.696 3.775,0.5 ccw(c4.15,0.5) 3.794,0.382 cw(c3.699,0.35) 3.799,0.35 cw(c3.699,0.35) 3.699,0.25
CHASSI_GND on POWER "POWER-CHASSI_GND 4" (solid, remove dead copper, pour order 0): 19.075,25.212 19.531,25.212 cw(c19.531,25.113) 19.602,25.183 19.917,24.867 ccw(c20.051,25) 19.933,24.853 cw(c19.871,24.775) 19.871,24.675 19.108,24.675 cw(c19.108,24.775) 19.008,24.775 cw(c19.108,24.775) 19.012,24.801 ccw(c18.65,24.9) 18.985,25.068 cw(c19.075,25.113)
CHASSI_GND on POWER "POWER-CHASSI_GND 5" (solid, remove dead copper, pour order 5): 13.003,4.725 16.776,4.725 cw(c16.776,4.625) 16.876,4.62 ccw(c17.25,4.6) 16.875,4.6 ccw(c17.25,4.6) 17.507,4.326 cw(c17.575,4.254) 17.643,4.326 ccw(c17.9,4.6) 18.157,4.326 cw(c18.225,4.254) 18.293,4.326 ccw(c18.55,4.6) 18.895,4.453 cw(c18.987,4.414) 19.027,4.506 ccw(c19.175,4.85) 19.412,4.559 cw(c19.475,4.482) 19.575,4.482 19.575,3.903 ccw(c19.95,3.903) 19.599,3.772 cw(c19.505,3.737) 19.505,3.638 11.694,3.638 cw(c11.694,3.737) 11.623,3.667 10.468,4.823 cw(c10.538,4.893) 10.47,4.967 ccw(c10.299,5.149) 10.477,4.973 10.727,5.223 ccw(c10.55,5.4) 10.8,5.4 10.8,5.425 cw(c10.9,5.425) 10.9,5.525 11.996,5.525 cw(c11.996,5.4) 12.085,5.488 12.738,4.835 ccw(c13.004,5.1)
P5V_IN on POWER "POWER-P5V_IN" (solid, remove dead copper, pour order 10): 359 vertices, not listed, extent 0.7,0.25 34,34.5
VDDC on POWER "POWER-VDDC" (solid, remove dead copper, pour order 6): 20.45,5.9 cw(c20.45,6.15) 20.2,6.15 20.2,6.85 ccw(c19.95,6.85) 20.142,7.01 cw(c20.219,7.074) 20.131,7.027 ccw(c19.8,6.85) 19.546,7.126 cw(c19.479,7.2) 19.479,7.1 17.004,7.1 ccw(c17.004,6.85) 16.827,7.027 16.173,6.373 cw(c15.996,6.55) 15.996,6.3 14.65,6.3 cw(c14.65,6.55) 14.4,6.55 14.4,7 cw(c14.65,7) 14.65,7.25 14.95,7.25 ccw(c14.95,7.5) 15.2,7.5 15.2,7.9 ccw(c14.95,7.9) 14.95,8.15 14.65,8.15 cw(c14.65,8.4) 14.4,8.4 14.4,8.75 cw(c14.65,8.75) 14.65,9 15.896,9 cw(c15.896,8.75) 16.073,8.927 16.327,8.673 ccw(c16.504,8.85) 16.504,8.6 16.644,8.6 cw(c16.644,8.5) 16.698,8.584 ccw(c16.9,8.9) 17.102,8.584 cw(c17.156,8.5) 17.156,8.6 19.432,8.6 cw(c19.432,8.5) 19.509,8.563 ccw(c19.8,8.8) 20.037,9.091 cw(c20.1,9.168) 20,9.168 20,9.432 cw(c20.1,9.432) 20.037,9.509 ccw(c19.8,9.8) 20.037,10.091 cw(c20.1,10.168) 20,10.168 20,11.529 cw(c20.1,11.529) 20.026,11.596 ccw(c19.75,11.85) 20.108,11.963 cw(c20.203,11.992) 20.172,12.087 cw(c20.25,11.85) 20.25,12.1 20.85,12.1 cw(c20.85,11.85) 21.1,11.85 21.1,11.804 ccw(c21.35,11.804) 21.173,11.627 21.497,11.303 cw(c21.426,11.232) 21.526,11.233 cw(c21.426,11.232) 21.526,11.226 ccw(c21.9,11.2) 21.525,11.2 ccw(c21.9,11.2) 21.584,10.998 cw(c21.5,10.944) 21.6,10.944 21.6,10.756 cw(c21.5,10.756) 21.584,10.702 ccw(c21.9,10.5) 21.589,10.29 cw(c21.506,10.235) 21.604,10.253 ccw(c21.85,10.3) 21.85,10.05 21.95,10.05 cw(c21.95,9.8) 22.2,9.8 22.2,9.4 cw(c21.95,9.4) 21.95,9.15 21.85,9.15 ccw(c21.85,8.9) 21.6,8.902 cw(c21.5,8.902) 21.595,8.87 ccw(c21.95,8.75) 21.575,8.75 21.575,8.1 ccw(c21.95,8.1) 21.595,7.98 cw(c21.5,7.948) 21.6,7.949 ccw(c21.85,7.95) 21.85,7.7 22.796,7.7 cw(c22.796,7.45) 22.973,7.627 22.977,7.623 ccw(c23.154,7.8) 23.154,7.55 24.15,7.55 cw(c24.15,7.3) 24.4,7.3 24.4,6.15 cw(c24.15,6.15) 24.15,5.9
CHASSI_GND on POWER "POWER-CHASSI_GND 6" (solid, remove dead copper, pour order 2): 14.65,6.175 15.997,6.175 ccw(c15.996,6.55) 16.262,6.285 16.915,6.938 cw(c17.004,6.85) 17.004,6.975 19.95,6.975 cw(c19.95,6.85) 20.075,6.85 20.075,6.15 ccw(c20.45,6.15) 20.101,6.012 cw(c20.008,5.975) 20.008,5.875 14.5,5.875 cw(c14.5,6) 14.375,6 14.375,6.108 cw(c14.475,6.108) 14.512,6.201 ccw(c14.65,6.55)
CHASSI_GND on GND "GND-CHASSI_GND" (solid, remove dead copper, pour order 14): 0.35,37.75 37.65,37.75 cw(c37.65,37.65) 37.75,37.65 37.75,0.35 cw(c37.65,0.35) 37.65,0.25 0.35,0.25 cw(c0.35,0.35) 0.25,0.35 0.25,37.65 cw(c0.35,37.65)
CHASSI_GND on TOP "TOP-CHASSI_GND" (solid, remove dead copper, pour order 13): 0.35,37.75 37.65,37.75 cw(c37.65,37.65) 37.75,37.65 37.75,0.35 cw(c37.65,0.35) 37.65,0.25 0.35,0.25 cw(c0.35,0.35) 0.25,0.35 0.25,37.65 cw(c0.35,37.65)
CHASSI_GND on BOTTOM "BOTTOM-CHASSI_GND" (solid, remove dead copper, pour order 12): 0.35,37.75 37.65,37.75 cw(c37.65,37.65) 37.75,37.65 37.75,0.35 cw(c37.65,0.35) 37.65,0.25 0.35,0.25 cw(c0.35,0.35) 0.25,0.35 0.25,37.65 cw(c0.35,37.65)

## Keep-outs
TOP:
  region: 21.1,19.95 21.1,20.25 21.8,20.25 21.8,19.95
  region: 13.9,27.1 13.9,27.4 14.6,27.4 14.6,27.1
  region: 26.45,10.75 26.45,11.45 26.15,11.45 26.15,10.75
  region: 20.85,2.15 20.85,1.85 20.15,1.85 20.15,2.15
  region: 1.45,32.25 1.45,32.85 2.45,32.85 2.45,32.25
  region: 16.8,19.4 16.8,18.7 16.5,18.7 16.5,19.4
  region: 2.75,32.1 2.75,32.4 3.45,32.4 3.45,32.1
  region: 21.45,17.45 21.45,17.15 20.75,17.15 20.75,17.45
  region: 17.5,21.45 17.5,21.75 18.2,21.75 18.2,21.45
  region: 3.75,32.1 3.75,32.4 4.45,32.4 4.45,32.1
  region: 19.75,18.15 19.75,17.85 20.45,17.85 20.45,18.15
  region: 3.85,29.45 3.85,29.15 4.55,29.15 4.55,29.45
  region: 30.5,14.45 30.5,15.15 30.2,15.15 30.2,14.45
  region: 17.2,21.45 17.2,21.75 16.5,21.75 16.5,21.45
BOTTOM:
  region: 14.55,18.85 14.55,18.15 14.25,18.15 14.25,18.85
  region: 14.55,21.8 14.55,21.1 14.25,21.1 14.25,21.8
  region: 23.75,17.9 23.75,18.6 24.05,18.6 24.05,17.9
  region: 28.75,23.75 28.75,23.05 29.05,23.05 29.05,23.75
  region: 14.55,17.85 14.55,17.15 14.25,17.15 14.25,17.85
  region: 34.3,25.85 34.3,25.15 34.6,25.15 34.6,25.85
  region: 14.55,19.85 14.55,19.15 14.25,19.15 14.25,19.85
  region: 3.45,17.45 3.45,17.15 4.15,17.15 4.15,17.45
  region: 28.15,29.85 28.15,28.45 29.95,28.45 29.95,29.85
  region: 8.65,7.05 8.65,7.75 8.95,7.75 8.95,7.05
  region: 17.1,22.95 17.1,22.25 16.8,22.25 16.8,22.95

## Other copper
TOP:
  region net SPI_VCC: 17.25,29.8 ccw(c17.25,29.6) 17.05,29.6 17.05,29.1 ccw(c17.25,29.1) 17.25,28.9 18.1,28.9 cw(c18.1,28.7) 18.3,28.7 18.3,28.5 ccw(c18.5,28.5) 18.5,28.3 19.9,28.3 ccw(c19.9,28.5) 20.1,28.5 20.1,28.85 ccw(c19.9,28.85) 19.9,29.05 19.3,29.05 cw(c19.3,29.25) 19.1,29.25 19.1,29.6 ccw(c18.9,29.6) 18.9,29.8
  region net VDDQ_1.35V: 17.255,4.3 cw(c17.255,4.23) 17.325,4.23 17.325,2.35 ccw(c17.575,2.35) 17.575,2.1 18.875,2.1 ccw(c18.875,2.35) 19.125,2.35 19.125,3 ccw(c18.875,3) 18.875,3.25 18.645,3.25 cw(c18.645,3.32) 18.575,3.32 18.575,4.23 cw(c18.645,4.23) 18.645,4.3 18.65,4.3 ccw(c18.65,4.45) 18.8,4.45 18.8,4.7 ccw(c18.6,4.7) 18.6,4.9 17.207,4.9 ccw(c17.207,4.693) 17,4.693 17,4.5 ccw(c17.2,4.5) 17.2,4.3
  region net SPI_VCC: 6.273,13.727 cw(c6.45,13.904) 6.2,13.904 6.2,14.6 cw(c6.45,14.6) 6.7,14.6 6.7,14.2 ccw(c6.95,14.2) 6.95,13.95 8.4,13.95 cw(c8.4,13.7) 8.65,13.7 8.65,13.504 cw(c8.4,13.504) 8.577,13.327 8.123,12.873 ccw(c8.3,12.696) 8.05,12.696 8.05,11.5 cw(c7.8,11.5) 7.8,11.25 7.55,11.25 7.55,12.346 ccw(c7.3,12.346) 7.477,12.523
  region net P5V_IN: 6.7,32.35 cw(c6.95,32.35) 6.95,32.6 7.65,32.6 cw(c7.65,32.35) 7.9,32.35 7.9,29.5 cw(c7.65,29.5) 7.65,29.25 6.95,29.25 cw(c6.95,29.5) 6.7,29.5
  region net GND_SIGNAL: 14.05,12.85 cw(c14.05,12.65) 14.25,12.65 14.25,11.975 cw(c14.05,11.975) 14.05,11.775 13.7,11.775 cw(c13.7,11.975) 13.5,11.975 13.5,12.167 cw(c13.7,12.167) 13.559,12.309 13.691,12.441 ccw(c13.55,12.583) 13.75,12.583 13.75,12.65 cw(c13.95,12.65) 13.95,12.85
  region net SPI_VCC: 10.95,28 cw(c11.15,28) 11.15,28.2 13.15,28.2 cw(c13.15,28) 13.35,28 13.35,25.2 ccw(c13.55,25.2) 13.55,25 14.3,25 cw(c14.3,24.8) 14.5,24.8 14.5,24.45 cw(c14.3,24.45) 14.3,24.25 13.55,24.25 ccw(c13.55,24.05) 13.35,24.05 13.35,23.35 cw(c13.15,23.35) 13.15,23.15 12.7,23.15 cw(c12.7,23.35) 12.5,23.35 12.5,25.5 ccw(c12.3,25.5) 12.3,25.7 11.4,25.7 ccw(c11.4,25.5) 11.2,25.5 11.2,23.35 cw(c11,23.35) 11,23.15 10.6,23.15 cw(c10.6,23.35) 10.4,23.35 10.4,26.3 cw(c10.6,26.3) 10.6,26.5 10.75,26.5 ccw(c10.75,26.7) 10.95,26.7
  region net IOVDD: 35.65,9.95 cw(c35.9,9.95) 35.9,10.2 36.55,10.2 cw(c36.55,9.95) 36.8,9.95 36.8,9.3 cw(c36.55,9.3) 36.55,9.05 35.9,9.05 cw(c35.9,9.3) 35.65,9.3
  region net P5V_IN: 17.3,34.2 cw(c17.55,34.2) 17.55,34.45 18.2,34.45 cw(c18.2,34.2) 18.45,34.2 18.45,33.5 cw(c18.2,33.5) 18.2,33.25 17.55,33.25 cw(c17.55,33.5) 17.3,33.5
  region net DVDD: 12.7,21.55 ccw(c12.7,21.35) 12.5,21.35 12.5,20.65 ccw(c12.65,20.65) 12.65,20.5 cw(c12.65,20.4) 12.75,20.4 12.75,18 ccw(c12.95,18) 12.95,17.8 16.592,17.8 ccw(c16.592,18) 16.734,17.859 16.954,18.079 cw(c17.095,17.938) 17.095,18.137 17.256,18.137 ccw(c17.256,18.337) 17.456,18.337 17.456,18.446 ccw(c17.206,18.446) 17.383,18.623 17.373,18.633 cw(c17.55,18.81) 17.3,18.81 17.3,19.05 ccw(c17.05,19.05) 16.8,19.05 16.8,18.8 cw(c16.6,18.8) 16.6,18.6 13.75,18.6 cw(c13.75,18.8) 13.55,18.8 13.55,21.35 ccw(c13.35,21.35) 13.35,21.55
  region net 5V_USB_OUT: 13.275,35.4 cw(c13.575,35.4) 13.575,35.7 14.15,35.7 cw(c14.15,35.4) 14.45,35.4 14.45,34.524 ccw(c14.75,34.524) 14.538,34.312 14.862,33.988 cw(c14.65,33.776) 14.95,33.776 14.95,33.5 cw(c14.65,33.5) 14.65,33.2 13.575,33.2 cw(c13.575,33.5) 13.275,33.5
  region net AVDD: 17.05,27.3 17.45,27.3 cw(c17.45,27.1) 17.65,27.1 17.65,25.35 cw(c17.45,25.35) 17.45,25.15 17,25.15 ccw(c17,24.95) 16.8,24.95 16.8,24.433 cw(c16.6,24.433) 16.741,24.291 15.509,23.059 ccw(c15.65,22.917) 15.45,22.917 15.45,21.65 ccw(c15.65,21.65) 15.65,21.45 18.65,21.45 ccw(c18.65,21.65) 18.85,21.65 18.85,21.75 21.338,21.75 cw(c21.338,21.525) 21.338,21.3 20.85,21.3 ccw(c20.85,21.1) 20.65,21.1 20.65,20.95 17.45,20.95 ccw(c17.45,19.7) 16.2,19.7 cw(c16,19.7) 15.8,19.7 15.8,20.267 ccw(c15.6,20.267) 15.741,20.409 14.75,21.4 14.75,23.45 15.941,24.641 ccw(c15.8,24.783) 16,24.783 16,26.25
  region net P5V_IN: 34,3.15 34,1.85 cw(c33.75,1.85) 33.75,1.6 33.1,1.6 cw(c33.1,1.85) 32.85,1.85 32.85,3.139 ccw(c32.6,3.139) 32.849,3.158 cw(c33.075,3.175) 33.05,3.4 33.75,3.4 cw(c33.75,3.15)
  region net VDDC: 21.9,6.025 cw(c21.9,6.275) 21.65,6.275 21.65,6.95 cw(c21.9,6.95) 21.9,7.2 cw(c21.9,6.95) 22.15,6.95 22.15,6.625 ccw(c22.4,6.625) 22.4,6.375 22.825,6.375 22.825,6.175 22.291,6.175 ccw(c22.291,5.925) 22.114,6.102 22.111,6.098 cw(c21.934,6.275) 21.934,6.025
  region net 12V_IN: 29,35.437 cw(c29.276,35.437) 29.276,35.714 29.924,35.714 cw(c29.924,35.437) 30.2,35.437 30.2,33.394 cw(c30,33.394) 30,33.194 29.55,33.194 cw(c29.55,33.394) 29.35,33.394 29.35,34.45 ccw(c29.25,34.45) 29.25,34.55 29.2,34.55 cw(c29.2,34.75) 29,34.75
  region net P5V_IN: 7.2,3.6 ccw(c7.2,3.35) 6.95,3.35 6.95,2.7 ccw(c7.2,2.7) 7.2,2.45 7.85,2.45 ccw(c7.85,2.7) 8.1,2.7 8.1,3.35 ccw(c7.85,3.35) 7.85,3.6
  region net SPI_VCC: 0.95,11.5 2.6,11.5 3.1,11 4.45,11 4.45,10.6 2.7,10.6 2.2,11.1 0.95,11.1
POWER:
  region net CHASSI_GND: 167 vertices and 12 holes, not listed, extent 0.25,0.25 37.75,37.75
BOTTOM:
  region net N19178196: 24.2,34.55 ccw(c24.2,34.35) 24,34.35 24,34.333 cw(c23.8,34.333) 23.941,34.191 23.109,33.359 ccw(c23.25,33.217) 23.05,33.217 23.05,30.5 ccw(c23.25,30.5) 23.25,30.3 23.95,30.3 ccw(c23.95,30.5) 24.15,30.5 24.15,32.967 cw(c24.35,32.967) 24.209,33.109 24.841,33.741 ccw(c24.7,33.883) 24.9,33.883 24.9,34.35 ccw(c24.7,34.35) 24.7,34.55
  region net N19299732: 10.65,4.55 ccw(c10.65,4.35) 10.45,4.35 10.45,1.4 ccw(c10.65,1.4) 10.65,1.2 11.35,1.2 ccw(c11.35,1.4) 11.55,1.4 11.55,3.154 ccw(c11.35,3.154) 11.45,3.327 cw(c11.55,3.5) 11.35,3.5 11.35,4.35 ccw(c11.15,4.35) 11.15,4.55
  region net P5V_IN: 21.95,30.3 ccw(c21.95,30.6) 22.25,30.6 22.25,32.05 ccw(c21.95,32.05) 21.95,32.35 18.75,32.35 cw(c18.75,32.65) 18.45,32.65 18.45,34.8 cw(c18.75,34.8) 18.75,35.1 19.75,35.1 ccw(c19.75,35.4) 20.05,35.4 20.05,35.6 17.6,35.6 ccw(c17.6,35.3) 17.3,35.3 17.3,31.6 ccw(c17.6,31.6) 17.6,31.3 20.625,31.3 cw(c20.625,31) 20.925,31 20.925,30.6 ccw(c21.225,30.6) 21.225,30.3
  region net P5V_IN: 3.675,23.183 cw(c3.425,23.183) 3.394,22.935 3.275,22.95 3.275,23.85 ccw(c3.025,23.85) 3.025,24.1 1.75,24.1 cw(c1.75,24.35) 1.5,24.35 1.5,25.05 cw(c1.75,25.05) 1.75,25.3 3.425,25.3 cw(c3.425,25.05) 3.675,25.05
  region net P5V_IN: 27.1,4.8 cw(c27.3,4.8) 27.3,5 28.05,5 cw(c28.05,4.8) 28.25,4.8 28.25,4.3 cw(c28.05,4.3) 28.05,4.1 27.85,4.1 cw(c27.85,4.3) 27.65,4.3 ccw(c27.45,4.3) 27.45,4.5 27.3,4.5 cw(c27.3,4.7) 27.1,4.7
  region net 12V_IN: 26.3,35.95 27.7,35.95 ccw(c27.7,36.15) 27.9,36.15 cw(c28.1,36.15) 28.1,36.35 29.85,36.35 cw(c29.85,36.15) 30.05,36.15 30.05,35.833 ccw(c30.25,35.833) 30.109,35.691 30.241,35.559 cw(c30.1,35.417) 30.3,35.417 30.3,34.65 cw(c30.1,34.65) 30.1,34.45 29.15,34.45 cw(c29.15,34.65) 28.95,34.65 28.95,35.05 ccw(c28.75,35.05) 28.75,35.25 28.3,35.25 ccw(c28.3,35.05) 28.1,35.05 28.1,34.9 24.2,34.9 cw(c24.2,35.1) 24,35.1 24,35.4 cw(c24.2,35.4) 24.2,35.6 26.1,35.6 ccw(c26.1,35.8) 26.3,35.8
  region net P5V_IN: 28.1,11.9 cw(c28.35,11.9) 28.35,12.15 31.15,12.15 cw(c31.15,11.9) 31.15,11.65 30.55,11.65 29.6,10.7 28.35,10.7 cw(c28.35,10.95) 28.1,10.95
  region net N19124268: 34.875,32.35 ccw(c34.875,32.6) 35.125,32.6 ccw(c34.875,32.6) 34.875,32.85 28.95,32.85 ccw(c28.95,32.6) 28.7,32.6 ccw(c28.95,32.6) 28.95,32.35 30.2,32.35 cw(c30.2,32.1) 30.45,32.1 30.45,31.2 ccw(c30.7,31.2) 30.7,30.95 34.2,30.95 ccw(c34.2,31.2) 34.45,31.2 34.45,32.1 cw(c34.7,32.1) 34.7,32.35
  region net P5V_IN: 8.15,4.55 ccw(c8.15,4.35) 7.95,4.35 7.95,3.8 cw(c7.75,3.8) 7.75,3.6 6.9,3.6 6.9,2.65 ccw(c7.1,2.65) 7.1,2.45 7.3,2.45 cw(c7.3,2.25) 7.5,2.25 7.5,1.5 ccw(c7.7,1.5) 7.7,1.3 8.1,1.3 ccw(c8.1,1.5) 8.3,1.5 8.3,2.017 cw(c8.5,2.017) 8.359,2.159 8.791,2.591 ccw(c8.65,2.733) 8.85,2.733 8.85,4.35 ccw(c8.65,4.35) 8.65,4.55
  region net SPI_VCC: 11.4,26.65 cw(c11.65,26.65) 11.65,26.9 12.35,26.9 cw(c12.35,26.65) 12.6,26.65 12.6,25.95 cw(c12.35,25.95) 12.35,25.7 11.65,25.7 cw(c11.65,25.95) 11.4,25.95
  region net SPI_VCC: 6.45,13.7 cw(c6.45,13.95) 6.2,13.95 6.2,14.6 cw(c6.45,14.6) 6.45,14.85 6.596,14.85 cw(c6.596,14.6) 6.773,14.777 6.977,14.573 ccw(c7.154,14.75) 7.154,14.5 7.596,14.5 cw(c7.596,14.25) 7.773,14.427 7.927,14.273 ccw(c8.104,14.45) 8.104,14.2 8.4,14.2 cw(c8.4,13.95) 8.4,13.7
  region net 5V_USB_OUT: 13.3,35.45 cw(c13.55,35.45) 13.55,35.7 16.45,35.7 cw(c16.45,35.45) 16.7,35.45 16.7,34.75 cw(c16.45,34.75) 16.45,34.5 13.55,34.5 cw(c13.55,34.75) 13.3,34.75
  region net IOVDD: 21,24.25 cw(c21.25,24.25) 21.25,24.5 22,24.5 22.5,24 22.5,23.35 21,23.35
  region net P5V_IN: 36.8,5.85 ccw(c36.55,5.85) 36.55,6.1 35.954,6.1 ccw(c35.954,5.85) 35.777,6.027 35.323,5.573 cw(c35.146,5.75) 35.146,5.5 34.9,5.5 ccw(c34.9,5.25) 34.65,5.25 34.65,4.704 cw(c34.4,4.704) 34.577,4.527 34.373,4.323 cw(c34.196,4.5) 34.196,4.25 33.85,4.25 ccw(c33.85,4) 33.6,4 33.6,3.8 cw(c33.35,3.8) 33.35,3.55 33.1,3.55 ccw(c33.1,3.3) 32.85,3.3 32.85,2.75 cw(c32.6,2.75) 32.6,2.5 29.8,2.5 ccw(c29.8,2.25) 29.55,2.25 29.55,1.85 ccw(c29.8,1.85) 29.8,1.6 33.75,1.6 ccw(c33.75,1.85) 34,1.85 34,2.596 cw(c34.25,2.596) 34.073,2.773 35.327,4.027 cw(c35.504,3.85) 35.504,4.1 36,4.1 ccw(c36,4.35) 36.25,4.35 36.25,4.646 cw(c36.5,4.646) 36.323,4.823 36.727,5.227 ccw(c36.55,5.404) 36.8,5.404
  region net VDDQ_1.35V: 17,5.25 cw(c17.25,5.25) 17.25,5.5 18.55,5.5 cw(c18.55,5.25) 18.8,5.25 18.8,4.604 cw(c18.55,4.604) 18.727,4.427 18.523,4.223 ccw(c18.7,4.046) 18.45,4.046 18.45,3.5 ccw(c18.7,3.5) 18.7,3.25 18.875,3.25 cw(c18.875,3) 19.125,3 19.125,2.35 cw(c18.875,2.35) 18.875,2.1 14.6,2.1 ccw(c14.6,1.85) 14.35,1.85 14.35,1.45 cw(c14.1,1.45) 14.1,1.2 12.6,1.2 cw(c12.6,1.45) 12.35,1.45 12.35,2.95 cw(c12.6,2.95) 12.6,3.2 16.75,3.2 ccw(c16.75,3.45) 17,3.45
  region net IOVDD: 36.8,9.95 ccw(c36.55,9.95) 36.55,10.2 34.9,10.2 ccw(c34.9,9.95) 34.65,9.95 34.65,7.35 ccw(c34.9,7.35) 34.9,7.1 35,7.1 ccw(c35,7.35) 35.25,7.35 35.25,7.996 cw(c35.5,7.996) 35.323,8.173 36.127,8.977 cw(c36.304,8.8) 36.304,9.05 36.55,9.05 ccw(c36.55,9.3) 36.8,9.3
  region net GND_SIGNAL: 13.873,13.777 ccw(c13.696,13.6) 13.696,13.85 13.3,13.85 ccw(c13.3,13.6) 13.05,13.6 13.05,12.6 ccw(c13.3,12.6) 13.3,12.35 14,12.35 ccw(c14,12.6) 14.25,12.6 14.25,13.296 ccw(c14,13.296) 14.177,13.473
  region net IOVDD: 18.95,24.25 cw(c19.2,24.25) 19.2,24.5 20,24.5 20.5,24 20.5,23.35 18.95,23.35
  region net N19981555: 29.05,7.9 29.05,5.9 29.55,5.4 29.55,4.1 30.15,4.1 30.15,7.9
  region net VDDC: 21,7.2 21,5.65 21.45,5.65 21.85,5.25 24.3,5.25 24.95,5.9 28.25,5.9 28.25,7.9 27.1,7.9 26.4,7.2

## Silkscreen, mask and mechanical layers (free items; w line width, h text height)
Top Overlay:
  region: 7.1,10.6 cw(c7.4,10.6) 7.4,10.9 12,10.9 cw(c12,10.6) 12.3,10.6 12.3,6 cw(c12,6) 12,5.7 11.124,5.7 cw(c11.124,6) 10.912,5.788 9.688,7.012 ccw(c9.476,6.8) 9.476,7.1 7.4,7.1 cw(c7.4,7.4) 7.1,7.4
Bottom Overlay:
  text "2021/12/16" at 14.7,29.6 h0.9
  text "WDMB-0006A-V01" at 21.2,28.1 h1
Top Solder:
  region: 7.175,6.825 cw(c7.375,6.825) 7.375,7.025 9.442,7.025 cw(c9.442,6.825) 9.584,6.966 10.291,6.259 cw(c10.15,6.117) 10.35,6.117 10.35,5.95 cw(c10.15,5.95) 10.15,5.75 7.375,5.75 cw(c7.375,5.95) 7.175,5.95
OUTLINE:
  the board outline again, w0.025
NCLEGEND-1-4:
  lines w0.025: 49.4,7.15 172.234,7.15 ; 49.4,13.5 172.234,13.5 ; 49.4,19.85 172.234,19.85 ; 49.4,26.2 172.234,26.2 ; 49.4,32.55 172.234,32.55 ; 49.4,38.9 172.234,38.9 ; 49.4,45.25 172.234,45.25 ; 49.4,51.6 172.234,51.6 ; 60.717,35.725 60.917,35.725 ; 60.817,35.625 60.817,35.825 ; 72.235,0.8 72.235,45.25 ; 120.266,0.8 120.266,45.25 ; 152.549,0.8 152.549,45.25 ; 49.4,0.8 49.4,58.1 172.234,58.1 172.234,0.8 49.4,0.8 ; 59.817,3.975 60.817,4.975 61.817,3.975 60.817,2.975 59.817,3.975 ; 59.992,10.325 60.234,9.742 60.817,9.5 61.401,9.742 61.642,10.325 61.401,10.908 60.817,11.15 60.234,10.908 59.992,10.325 ; 60.067,16.3 60.817,15.77 61.567,16.3 61.567,17.05 60.817,17.58 60.067,17.05 60.067,16.3 ; 60.425,23.025 60.655,22.7 60.98,22.7 61.21,23.025 60.98,23.35 60.655,23.35 60.425,23.025 ; 60.692,29.25 60.942,29.25 60.942,29.5 60.692,29.5 60.692,29.25
  text "DRILL CHART: TOP to BOTTOM" at 77.797,53.338 h3.17
  text "ALL UNITS ARE IN MILLIMETERS" at 75.257,46.838 h3.17
  text "FIGURE" at 53.197,40.488 h3.17
  text "SIZE" at 91.17,40.488 h3.17
  text "PLATED" at 128.788,40.488 h3.17
  text "QTY" at 158.582,40.488 h3.17
  text "0.2" at 92.44,34.138 h3.17
  text "PLATED" at 128.788,34.138 h3.17
  text "22" at 159.852,34.138 h3.17
  text "0.25" at 91.17,27.788 h3.17
  text "PLATED" at 128.788,27.788 h3.17
  text "439" at 158.582,27.788 h3.17
  text "0.65" at 91.17,21.438 h3.17
  text "PLATED" at 128.788,21.438 h3.17
  text "3" at 161.122,21.438 h3.17
  text "1.5" at 92.44,15.088 h3.17
  text "PLATED" at 128.788,15.088 h3.17
  text "1" at 161.122,15.088 h3.17
  text "1.65" at 91.17,8.738 h3.17
  text "PLATED" at 128.788,8.738 h3.17
  text "2" at 161.122,8.738 h3.17
  text "2.0" at 92.44,2.388 h3.17
  text "PLATED" at 128.788,2.388 h3.17
  text "4" at 161.122,2.388 h3.17
DRAWING_ORIGIN:
  lines w0.025: -0.2,0 0.2,0 ; 0,-0.2 0,0.2